# Altium PCB NB3000XN.PcbDoc (part 12 of 71)
Units mil, origin at the board's own origin, x right, y up, seen from the top; angles counter-clockwise.
Board outline 9527.56 x 6929.77 mil, 6 copper layers (Top Layer, GND+SHIELD, MidLayer1, MidLayer2, P2 - 3V3+5V0, Bottom Layer), stack 62.375 mil thick; 832 components, 1027 nets, 4655 pads, 4981 vias.
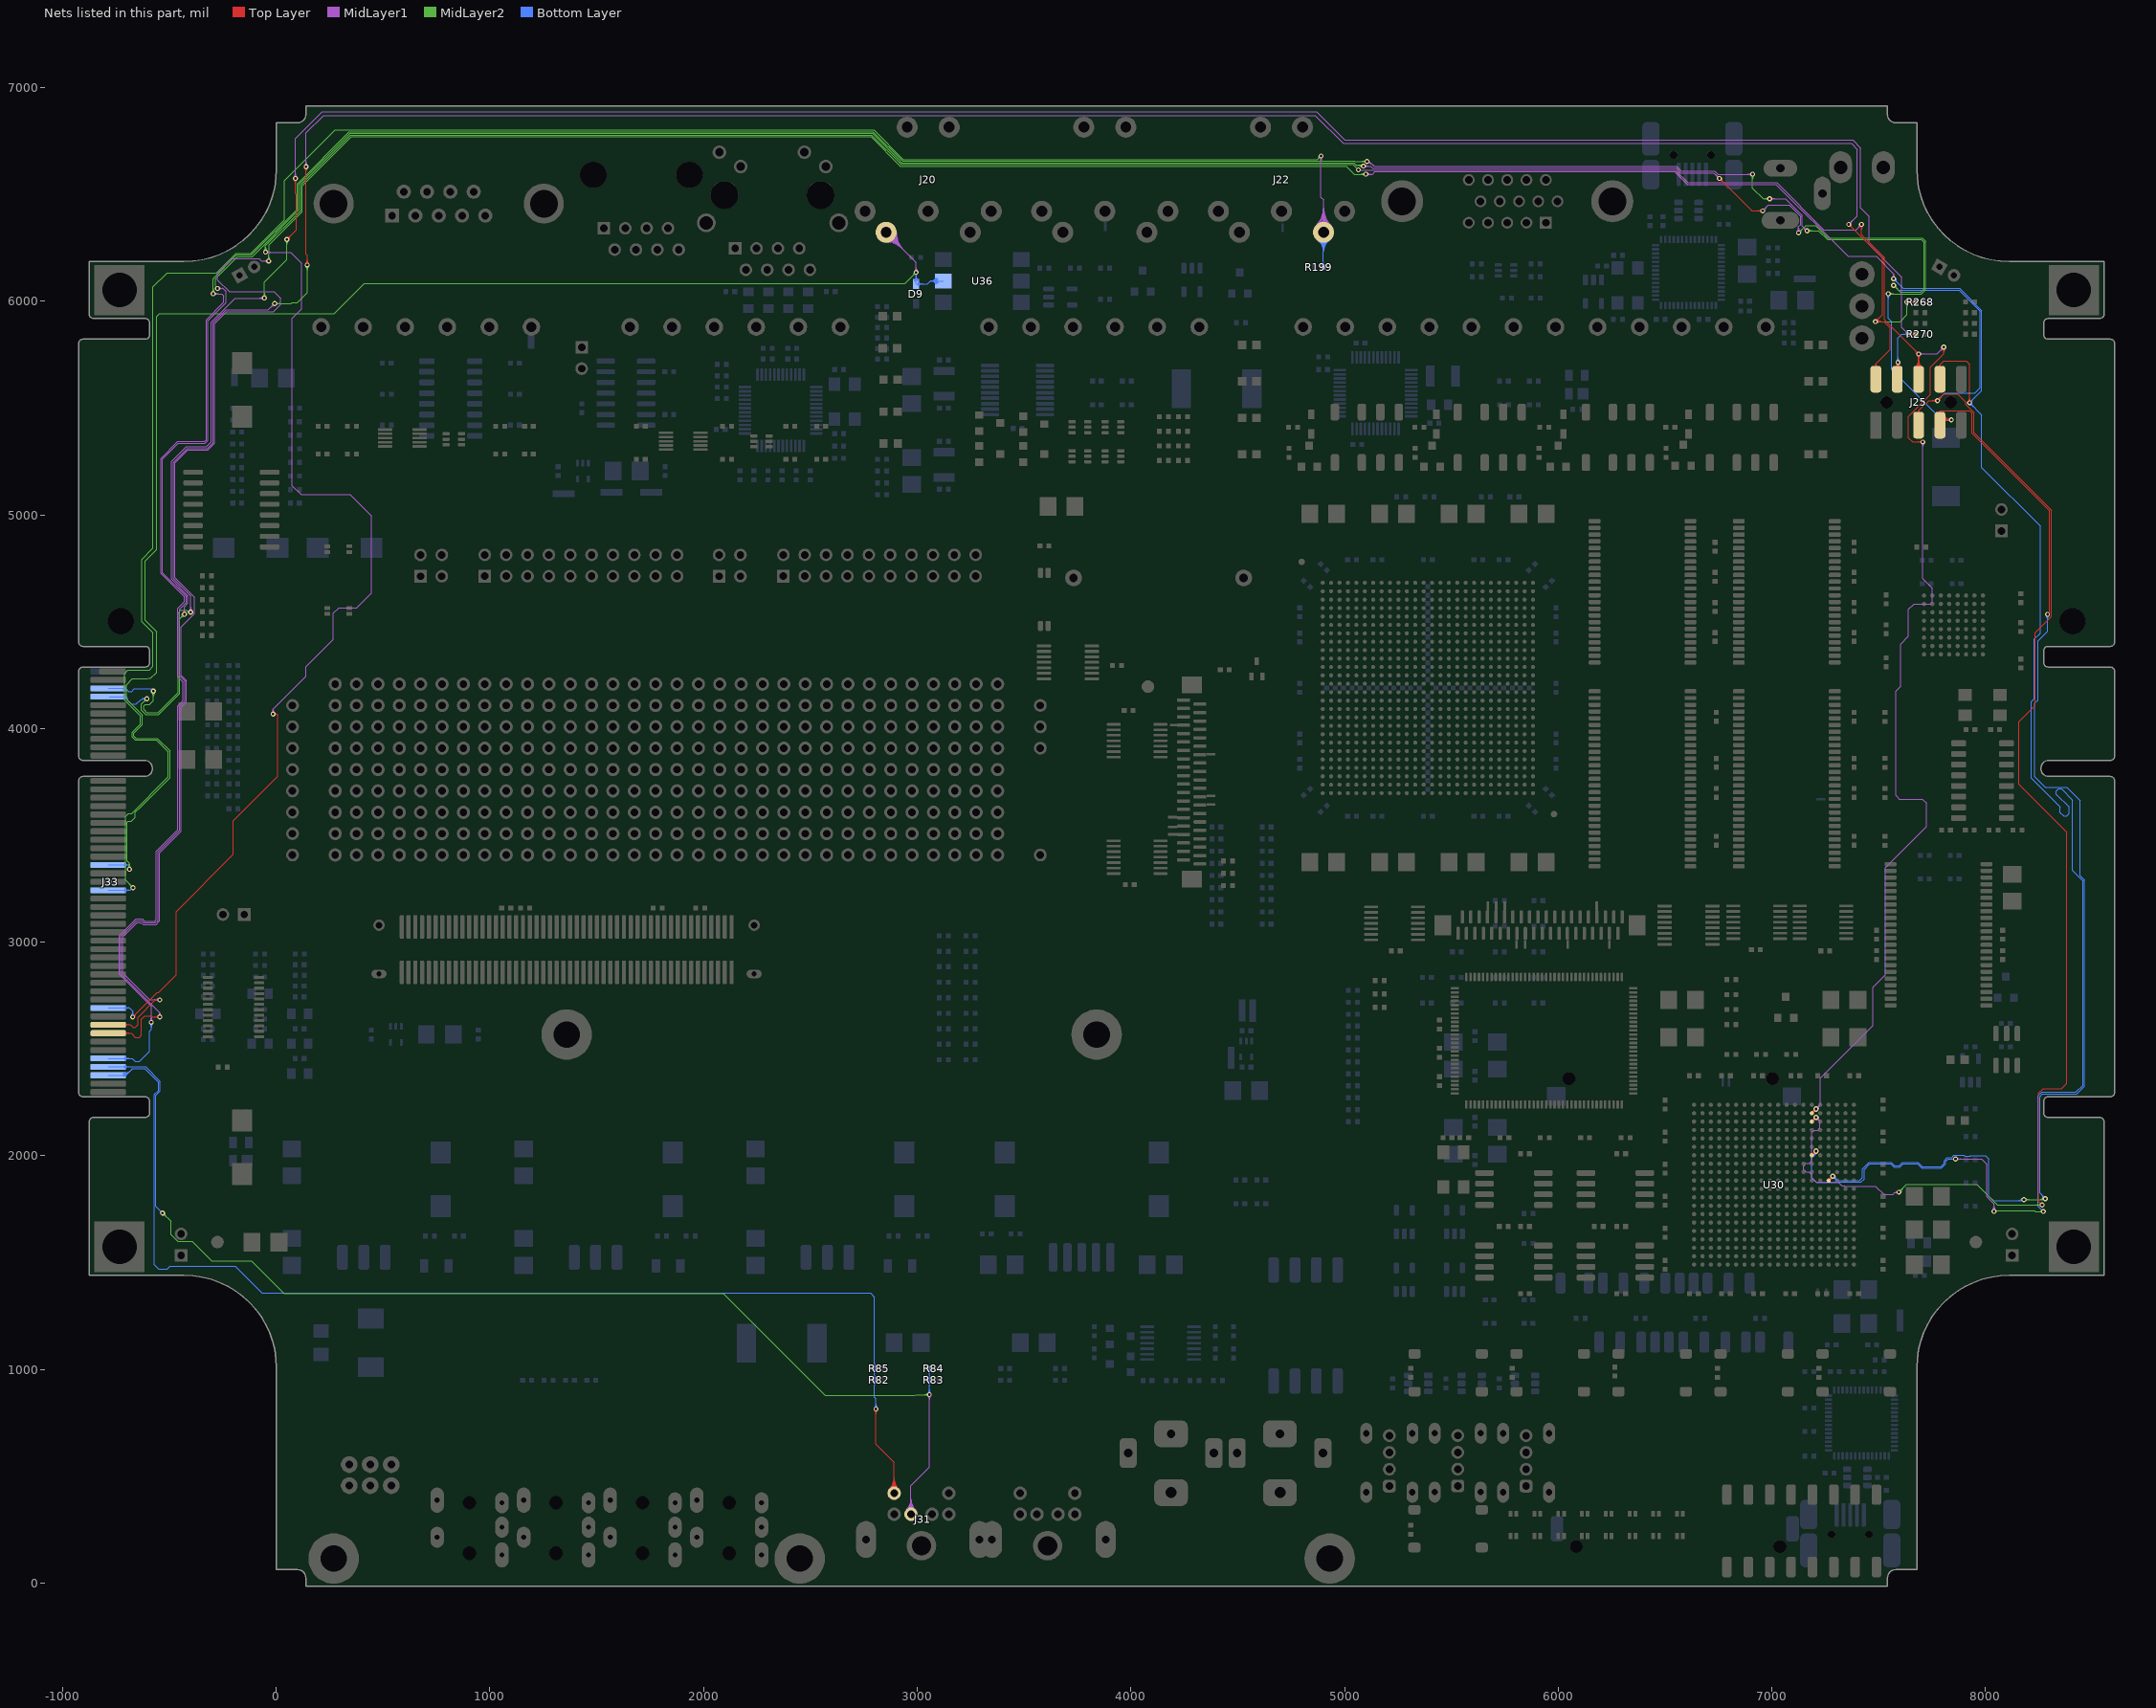
[diagram p16: the nets of this part, all layers, seen from the top]

## Via types
v1: diameter 23, hole 11.81, Top Layer to Bottom Layer, 3672 vias
v2: diameter 26, hole 11.81, Top Layer to Bottom Layer, 461 vias
v3: diameter 19, hole 11.81, Top Layer to Bottom Layer, tented both sides, 396 vias
v4: diameter 23.62, hole 11.81, Top Layer to Bottom Layer, 288 vias
v5: diameter 20, hole 11.81, Top Layer to Bottom Layer, 91 vias
v6: diameter 23, hole 11.81, Top Layer to Bottom Layer, tented both sides, 50 vias
v7: diameter 31, hole 11.81, Top Layer to Bottom Layer, 15 vias
v8: diameter 27.56, hole 11.81, Top Layer to Bottom Layer, tented both sides, 4 vias
v9: diameter 29, hole 11.81, Top Layer to Bottom Layer, 3 vias
v10: diameter 21, hole 11.81, Top Layer to Bottom Layer, 1 vias

## Nets (pads, with @x,y where several pads share a name; then routed paths per layer and width w, separated by ;. In a path a pad name is that pad's centre, name@x,y a point inside that pad or via, vN(x,y) a via of type N, cw(c..) or ccw(c..) an arc to the next point about the centre after c; other vN are vias at no path point) (continued)
ATE.HOST_JTAG.HARD.TDO: J25.2 J33.B3 R268.1 | length 13855.9
  Top Layer w4: v4@133.06,6623.06 cw(c116.31,6606.31) 140,6606.31 cw(c163.69,6606.31) v4@146.94,6623.06 ; v4@135.89,6625.89 cw(c125.97,6615.97) 140,6615.97 cw(c154.03,6615.97) v4@144.11,6625.89 ; v4@138.06,6176.94 ccw(c121.31,6193.69) 145,6193.69 ccw(c168.69,6193.69) v4@151.94,6176.94 ; v4(140,6630) 140,6220 145,6215 v4(145,6170) ; v4@140.89,6174.11 ccw(c130.97,6184.03) 145,6184.03 ccw(c159.03,6184.03) v4@149.11,6174.11 ; v4@7360,6350.19 cw(c7360,6326.5) 7376.75,6343.25 cw(c7393.5,6360) v4@7369.81,6360 ; v4@7360,6354.19 cw(c7360,6340.16) 7369.92,6350.08 cw(c7379.84,6360) v4@7365.81,6360 ; v4(7360,6360) 7518.05,6201.95 7518.05,5938.05 v4(7485,5905) 7524.05,5905 7555,5874.05 7555,5775 7486.99,5706.99 ; J25.2@7478.3,5694.04 ccw(c7473.01,5706.99) 7486.99,5706.99 ; J25.2@7479.81,5690.34 ccw(c7475.44,5701.04) 7486.99,5701.04 ccw(c7498.55,5701.04) J25.2@7494.18,5690.34 ; J25.2@7481.58,5695.1 ccw(c7479.91,5701.99) 7486.99,5701.99 ; J25.2@7484.89,5574.85 cw(c7484.68,5572.54) 7486.99,5572.54 ; v4@7485,5910.81 ccw(c7485,5924.84) 7494.92,5914.92 ccw(c7504.84,5905) v4@7490.81,5905 ; v4@7485,5914.81 ccw(c7485,5938.5) 7501.75,5921.75 ccw(c7518.5,5905) v4@7494.81,5905 ; J25.2@7489.1,5574.85 ccw(c7489.31,5572.54) 7486.99,5572.54 ; v4@7489.11,5900.89 cw(c7499.03,5890.97) 7499.03,5905 cw(c7499.03,5919.03) v4@7489.11,5909.11 ; v4@7491.94,5898.06 cw(c7508.69,5881.31) 7508.69,5905 cw(c7508.69,5928.69) v4@7491.94,5911.94 ; J25.2@7492.41,5695.1 cw(c7494.08,5701.99) 7486.99,5701.99 ; J25.2@7495.69,5694.04 cw(c7500.98,5706.99) 7486.99,5706.99 ; v4(7632,5997) R268.1@7673.82,5997 ; v4@7636.11,5992.89 cw(c7646.03,5982.97) 7646.03,5997 cw(c7646.03,6011.03) v4@7636.11,6001.11 ; v4@7638.94,5990.06 cw(c7655.69,5973.31) 7655.69,5997 cw(c7655.69,6020.69) v4@7638.94,6003.94 ; R268.1@7667.23,5990.41 ccw(c7651.32,5974.5) 7651.32,5997 ccw(c7651.32,6019.5) R268.1@7667.23,6003.59 ; R268.1@7670.06,5993.24 ccw(c7660.98,5984.16) 7660.98,5997 ccw(c7660.98,6009.84) R268.1@7670.06,6000.76 ; 7486.99,5572.54 J25.2@7486.99,5635.25 ; J25.2@7486.99,5635.25 J25.2@7486.99,5635.59 ; J25.2@7486.99,5635.25 J25.2@7486.99,5635.59 ; J25.2@7486.99,5635.59 7486.99,5706.99 ; J25.2@7486.99,5635.59 7486.99,5701.99
  MidLayer1 w4: v4@-406.94,4551.94 ccw(c-423.69,4568.69) -400,4568.69 ccw(c-376.31,4568.69) v4@-393.06,4551.94 ; v4@-404.11,4549.11 ccw(c-414.03,4559.03) -400,4559.03 ccw(c-385.97,4559.03) v4@-395.89,4549.11 ; v4(-400,4545) -400,4620 -407.83,4627.84 -482,4702 -482,5246.69 -417.12,5311.56 -322.46,5311.56 -295.52,5338.51 -295.52,5899.23 -234.74,5960 -36.47,5960 v4(-7.38,5989.09) ; v4@-17.19,5989.09 cw(c-40.87,5989.09) -24.13,5972.34 cw(c-7.38,5955.59) v4@-7.38,5979.28 ; v4@-13.19,5989.09 cw(c-27.22,5989.09) -17.3,5979.17 cw(c-7.38,5969.25) v4@-7.38,5983.28 ; v4@133.06,6636.94 ccw(c116.31,6653.69) 140,6653.69 ccw(c163.69,6653.69) v4@146.94,6636.94 ; v4@135.89,6634.11 ccw(c125.97,6644.03) 140,6644.03 ccw(c154.03,6644.03) v4@144.11,6634.11 ; v4(140,6630) 140,6788.69 221.59,6870.28 4862.1,6870.28 4993.37,6739 7372.06,6739 7400,6711.06 7400,6400 v4(7360,6360) ; v4@7360,6365.81 ccw(c7360,6379.84) 7369.92,6369.92 ccw(c7379.84,6360) v4@7365.81,6360 ; v4@7360,6369.81 ccw(c7360,6393.5) 7376.75,6376.75 ccw(c7393.5,6360) v4@7369.81,6360
  MidLayer2 w4: v4@-581.94,4168.06 cw(c-598.69,4151.31) -575,4151.31 cw(c-551.31,4151.31) v4@-568.06,4168.06 ; v4@-579.11,4170.89 cw(c-589.03,4160.97) -575,4160.97 cw(c-560.97,4160.97) v4@-570.89,4170.89 ; v4(-575,4175) -575,4131.31 -593.81,4112.5 -612.5,4112.5 -620,4105 -620,4090 -605.61,4075.61 -551.61,4075.61 -458.98,4168.24 -458.98,4541.21 -447.19,4553 -420,4553 -412,4545 v4(-400,4545) ; v4(-7.38,5989.09) 70.59,5989.09 75,5993.5 98.5,5993.5 145,6040 v4(145,6170) ; v4@-3.27,5984.98 cw(c6.65,5975.06) 6.65,5989.09 cw(c6.65,6003.12) v4@-3.27,5993.2 ; v4@-0.44,5982.15 cw(c16.31,5965.4) 16.31,5989.09 cw(c16.31,6012.77) v4@-0.44,5996.02 ; v4@138.06,6163.06 cw(c121.31,6146.31) 145,6146.31 cw(c168.69,6146.31) v4@151.94,6163.06 ; v4@140.89,6165.89 cw(c130.97,6155.97) 145,6155.97 cw(c159.03,6155.97) v4@149.11,6165.89 ; v4(7485,5905) 7600,5905 7632,5937 v4(7632,5997) ; v4@7489.11,5900.89 cw(c7499.03,5890.97) 7499.03,5905 cw(c7499.03,5919.03) v4@7489.11,5909.11 ; v4@7491.94,5898.06 cw(c7508.69,5881.31) 7508.69,5905 cw(c7508.69,5928.69) v4@7491.94,5911.94 ; v4@7625.06,5990.06 cw(c7608.31,5973.31) 7632,5973.31 cw(c7655.69,5973.31) v4@7638.94,5990.06 ; v4@7627.89,5992.89 cw(c7617.97,5982.97) 7632,5982.97 cw(c7646.03,5982.97) v4@7636.11,5992.89
  Bottom Layer w4: J33.B3@-785.98,4188.29 -705.14,4188.29 -691.06,4174.21 -676.56,4174.21 -664.89,4185.87 -580.87,4185.87 v4@-575,4180 ; J33.B3@-717.13,4188.51 cw(c-713.23,4170.99) -700.53,4183.68 ; J33.B3@-716.26,4184.61 cw(c-711.35,4162.57) -695.39,4178.53 ; J33.B3@-715.39,4180.7 cw(c-709.47,4154.15) -690.24,4173.39
ATE.HOST_JTAG.HARD.TMS: J25.4 J33.B4 R270.1 | length 13306.8
  Top Layer w4: v4(50,6290) 95,6335 95,6500 90,6505 v4(90,6575) ; v4@50,6295.81 ccw(c50,6309.84) 59.92,6299.92 ccw(c69.84,6290) v4@55.81,6290 ; v4@50,6299.81 ccw(c50,6323.5) 66.75,6306.75 ccw(c83.5,6290) v4@59.81,6290 ; v4@83.06,6568.06 cw(c66.31,6551.31) 90,6551.31 cw(c113.69,6551.31) v4@96.94,6568.06 ; v4@85.89,6570.89 cw(c75.97,6560.97) 90,6560.97 cw(c104.03,6560.97) v4@94.11,6570.89 ; J25.4@7577.2,5693.56 ccw(c7567.56,5714.04) v1(7590.19,5714.04) ; J25.4@7578.9,5689.94 ccw(c7570.52,5707.74) v1@7590.19,5707.74 ; J25.4@7580.6,5686.32 ccw(c7573.49,5701.43) 7590.19,5701.43 ; v1@7583.47,5707.32 cw(c7567.26,5691.11) 7590.19,5691.11 cw(c7613.13,5691.11) v1@7596.91,5707.32 ; J25.4@7585,5630 J25.4@7590.19,5635.19 ; v1@7586.3,5710.15 cw(c7576.91,5700.76) 7590.19,5700.76 cw(c7603.47,5700.76) v1@7594.08,5710.15 ; J25.4@7590.19,5635.25 v1(7590.19,5714.04) ; v1@7590.19,5705.7 ccw(c7613.44,5705.7) J25.4@7598.89,5687.57 ; J25.4@7601.39,5690.69 cw(c7620.13,5714.04) v1(7590.19,5714.04) ; v4(7640,5845) 7672.82,5845 R270.1@7673.82,5846 ; v4@7644.11,5840.89 cw(c7654.03,5830.97) 7654.03,5845 cw(c7654.03,5859.03) v4@7644.11,5849.11 ; v4@7646.94,5838.06 cw(c7663.69,5821.31) 7663.69,5845 cw(c7663.69,5868.69) v4@7646.94,5851.94 ; v4@7650.09,5845 ccw(c7650.09,5869.23) R270.1@7667.23,5852.1 ; 7652.55,5845 cw(c7652.55,5824.24) R270.1@7667.23,5838.92 ; 7659.75,5845 ccw(c7659.75,5859.57) R270.1@7670.06,5849.27 ; 7662.2,5845 cw(c7662.2,5833.89) R270.1@7670.06,5841.75
  MidLayer1 w4: v4@-436.94,4541.94 ccw(c-453.69,4558.69) -430,4558.69 ccw(c-406.31,4558.69) v4@-423.06,4541.94 ; v4@-434.11,4539.11 ccw(c-444.03,4549.03) -430,4549.03 ccw(c-415.97,4549.03) v4@-425.89,4539.11 ; v4(-430,4535) -430,4570.19 -413.5,4586.69 -413.5,4622.19 -490,4698.69 -490,5250 -420.44,5319.56 -325.78,5319.56 -303.52,5341.82 -303.52,5902.54 -191.06,6015 v4(-55,6015) ; v4@-61.94,6008.06 ccw(c-78.69,5991.31) -78.69,6015 ccw(c-78.69,6038.69) v4@-61.94,6021.94 ; v4@-59.11,6010.89 ccw(c-69.03,6000.97) -69.03,6015 ccw(c-69.03,6029.03) v4@-59.11,6019.11 ; v4@83.06,6581.94 ccw(c66.31,6598.69) 90,6598.69 ccw(c113.69,6598.69) v4@96.94,6581.94 ; v4@85.89,6579.11 ccw(c75.97,6589.03) 90,6589.03 ccw(c104.03,6589.03) v4@94.11,6579.11 ; v4(90,6575) 90,6761.31 214.96,6886.28 4868.72,6886.28 5000,6755 7378.69,6755 7416,6717.69 7416,6436.31 7454.85,6397.46 7454.85,6266.46 7590.26,6131.06 7608,6113.31 7608,5947 7608,5877 v4(7640,5845) ; v4@7630.19,5845 ccw(c7606.5,5845) 7623.25,5861.75 ccw(c7640,5878.5) v4@7640,5854.81 ; v4@7634.19,5845 ccw(c7620.16,5845) 7630.08,5854.92 ccw(c7640,5864.84) v4@7640,5850.81
  MidLayer2 w4: v4@-614.81,4140 cw(c-638.5,4140) -621.75,4123.25 cw(c-605,4106.5) v4@-605,4130.19 ; v4@-610.81,4140 cw(c-624.84,4140) -614.92,4130.08 cw(c-605,4120.16) v4@-605,4134.19 ; v4(-605,4140) -630,4115 -630,4085 -610,4065 -550.9,4065 -450.98,4164.93 -450.98,4514.02 v4(-430,4535) ; v4@-439.81,4535 cw(c-463.5,4535) -446.75,4518.25 cw(c-430,4501.5) v4@-430,4525.19 ; v4@-435.81,4535 cw(c-449.84,4535) -439.92,4525.08 cw(c-430,4515.16) v4@-430,4529.19 ; v4@-61.94,6021.94 ccw(c-78.69,6038.69) -55,6038.69 ccw(c-31.31,6038.69) v4@-48.06,6021.94 ; v4@-59.11,6019.11 ccw(c-69.03,6029.03) -55,6029.03 ccw(c-40.97,6029.03) v4@-50.89,6019.11 ; v4(-55,6015) -55,6090 50,6195 v4(50,6290) ; v4@43.06,6283.06 cw(c26.31,6266.31) 50,6266.31 cw(c73.69,6266.31) v4@56.94,6283.06 ; v4@45.89,6285.89 cw(c35.97,6275.97) 50,6275.97 cw(c64.03,6275.97) v4@54.11,6285.89
  Bottom Layer w4: J33.B4@-780,4148.92 -703.95,4148.92 -695,4139.98 -695,4131 -679,4115 -655,4115 -633.87,4136.13 -629.86,4136.13 -625.99,4140 ; J33.B4@-717.17,4149.13 cw(c-711.42,4135.58) -701.01,4145.99 ; J33.B4@-715.61,4145.45 cw(c-708.92,4129.69) -696.82,4141.79 ; v4@-612.53,4133.71 ccw(c-625.99,4122.46) -625.99,4140 ; v4@-612.53,4146.29 cw(c-625.99,4157.54) -625.99,4140 ; v4@-609.46,4136.27 ccw(c-617.43,4129.61) -617.43,4140 ccw(c-617.43,4150.39) v4@-609.46,4143.73 ; v4(-605,4140) -625.99,4140 ; v1@7583.47,5720.76 ccw(c7567.26,5736.98) 7590.19,5736.98 ccw(c7613.13,5736.98) v1@7596.91,5720.76 ; v1@7586.3,5717.93 ccw(c7576.91,5727.32) 7590.19,5727.32 ccw(c7603.47,5727.32) v1@7594.08,5717.93 ; v1(7590.19,5714.04) 7590.19,5827.37 7607.82,5845 v4(7640,5845) ; v4@7633.06,5838.06 ccw(c7616.31,5821.31) 7616.31,5845 ccw(c7616.31,5868.69) v4@7633.06,5851.94 ; v4@7635.89,5840.89 ccw(c7625.97,5830.97) 7625.97,5845 ccw(c7625.97,5859.03) v4@7635.89,5849.11
ATE.HOST_JTAG.SOFT.TCK: J25.7 J33.A42 U30.D10 | length 21667.9
  Top Layer w4: J33.A42@-785.98,2574.12 -679.12,2574.12 -660,2555 -640,2555 -630,2565 -630,2640 -615,2655 -585,2655 -580,2650 v4(-545,2650) ; J33.A42@-711.58,2568.62 cw(c-698.3,2555.34) -698.3,2574.12 cw(c-698.3,2592.9) J33.A42@-711.58,2579.62 ; J33.A42@-708.76,2565.79 cw(c-688.65,2545.68) -688.65,2574.12 cw(c-688.65,2602.56) J33.A42@-708.76,2582.45 ; v4@-551.94,2643.06 ccw(c-568.69,2626.31) -568.69,2650 ccw(c-568.69,2673.69) v4@-551.94,2656.94 ; v4@-549.11,2645.89 ccw(c-559.03,2635.97) -559.03,2650 ccw(c-559.03,2664.03) v4@-549.11,2654.11 ; v4@6755,6565.19 cw(c6755,6541.5) 6771.75,6558.25 cw(c6788.5,6575) v4@6764.81,6575 ; v4@6755,6569.19 cw(c6755,6555.16) 6764.92,6565.08 cw(c6774.84,6575) v4@6760.81,6575 ; v4(6755,6575) 6907,6423 v4(6957,6423) ; v4@6950.06,6416.06 ccw(c6933.31,6399.31) 6933.31,6423 ccw(c6933.31,6446.69) v4@6950.06,6429.94 ; v4@6952.89,6418.89 ccw(c6942.97,6408.97) 6942.97,6423 ccw(c6942.97,6437.03) v4@6952.89,6427.11 ; J25.7@7781.58,5480.1 ccw(c7779.91,5486.99) 7786.99,5486.99 ; J25.7@7789.78,5458.88 ccw(c7810.35,5467.19) J25.7@7810.35,5445 ; J25.7@7792.41,5480.1 cw(c7794.08,5486.99) 7786.99,5486.99 ; J25.7@7793.48,5460.37 ccw(c7816.28,5469.58) 7816.28,5445 ; J25.7@7797.19,5461.87 ccw(c7822.21,5471.98) 7822.21,5445 ; J25.7@7800.9,5463.37 ccw(c7828.14,5474.38) 7828.14,5445 ; J25.7@7803.26,5441.49 cw(c7811.73,5433.01) J25.7@7811.73,5445 ; J25.7@7804.61,5464.87 ccw(c7834.07,5476.77) v4@7834.07,5445 ; J25.7@7808.32,5466.37 ccw(c7840,5479.17) v4(7840,5445) ; v4@7833.06,5438.06 ccw(c7816.31,5421.31) 7816.31,5445 ccw(c7816.31,5468.69) v4@7833.06,5451.94 ; v4@7835.89,5440.89 ccw(c7825.97,5430.97) 7825.97,5445 ccw(c7825.97,5459.03) v4@7835.89,5449.11 ; v4(7840,5445) J25.7@7811.74,5445 ; v4(8290,4535) 8299.81,4544.81 8299.81,5018.88 7937,5381.69 7937,5476.5 7924.75,5488.75 7788.75,5488.75 7786.99,5486.99 ; 7786.99,5486.99 J25.7@7786.99,5420.25 J25.7@7811.74,5445
  Top Layer w8: U30.D10@7265.91,1884.68 v2(7285.59,1904.37) ; U30.D10@7265.91,1890.53 ccw(c7265.91,1904.63) 7275.88,1894.66 ccw(c7285.85,1884.68) U30.D10@7271.75,1884.68 ; v2@7276.59,1904.37 cw(c7254.86,1904.37) 7270.23,1889.01 cw(c7285.59,1873.64) v2@7285.59,1895.37
  MidLayer1 w4: -553,3211.14 -553,3103.31 -565.11,3091.21 -619.58,3091.21 -628.91,3100.54 -653.35,3100.54 -726.5,3027.39 -726.5,2852.79 -545,2671.29 ; -552.98,3211.16 -552.98,3422.93 -460.78,3515.13 -452.81,3523.1 -452.81,4103.31 -428,4128.12 -428,4221.88 -452.81,4246.69 -452.81,4558.69 -421.5,4590 -421.5,4618.88 -532.14,4729.52 -532.14,5261.54 -458.12,5335.56 -332.4,5335.56 -319.52,5348.45 -319.52,5909.17 -235,5993.69 -235,6045.19 -249.15,6059.34 ; v4@-551.37,2657.46 ccw(c-563.2,2671.29) -545,2671.29 ; v4@-548.78,2654.42 ccw(c-555.78,2662.61) -545,2662.61 ccw(c-534.22,2662.61) v4@-541.22,2654.42 ; v4(-545,2650) -545,2671.29 ; v4@-538.63,2657.46 cw(c-526.8,2671.29) -545,2671.29 ; v4(-275,6060) -249.15,6060 ; v4@-270.89,6055.89 cw(c-260.97,6045.97) -260.97,6060 cw(c-260.97,6074.03) v4@-270.89,6064.11 ; v4@-268.06,6053.06 cw(c-251.31,6036.31) -251.31,6060 cw(c-251.31,6083.69) v4@-268.06,6066.94 ; v4(5088.13,6632.81) 5122.19,6632.81 5132,6623 6550.25,6623 6571.69,6601.56 6728.44,6601.56 v4(6755,6575) ; v4@5092.23,6628.7 cw(c5102.15,6618.78) 5102.15,6632.81 cw(c5102.15,6646.84) v4@5092.23,6636.92 ; v4@5095.06,6625.87 cw(c5111.81,6609.13) 5111.81,6632.81 cw(c5111.81,6656.5) v4@5095.06,6639.75 ; v4@6745.19,6575 ccw(c6721.5,6575) 6738.25,6591.75 ccw(c6755,6608.5) v4@6755,6584.81 ; v4@6749.19,6575 ccw(c6735.16,6575) 6745.08,6584.92 ccw(c6755,6594.84) v4@6755,6580.81 ; v4(6957,6423) 6984,6450 7082.01,6450 7134.58,6397.42 7134.58,6359.84 7125,6350.25 v4(7125,6320) ; v4@6957,6428.81 ccw(c6957,6442.84) 6966.92,6432.92 ccw(c6976.84,6423) v4@6962.81,6423 ; v4@6957,6432.81 ccw(c6957,6456.5) 6973.75,6439.75 ccw(c6990.5,6423) v4@6966.81,6423 ; v4@7118.06,6326.94 ccw(c7101.31,6343.69) 7125,6343.69 ccw(c7148.69,6343.69) v4@7131.94,6326.94 ; v4@7120.89,6324.11 ccw(c7110.97,6334.03) 7125,6334.03 ccw(c7139.03,6334.03) v4@7129.11,6324.11
  MidLayer2 w4: v4(-275,6060) -285,6070 -285,6105 -181.05,6208.95 -112.36,6208.95 106,6427.31 106,6546.94 345.06,6786 2790.31,6786 2911.31,6665 2928.31,6648 5043.31,6648 5054.31,6637 ; 5063.98,6637 cw(c5063.98,6608.67) v4@5084.02,6628.7 ; 5073.64,6637 cw(c5073.64,6618.33) v4@5086.85,6631.53 ; 5074.55,6637 ccw(c5074.55,6646.38) v4@5081.19,6639.75 ; v4@5081.19,6625.87 ccw(c5054.33,6599.01) 5054.33,6637 ; v4(5088.13,6632.81) 5092.19,6632.81 5088,6637 5054.31,6637 ; v4(7125,6320) 7160,6355 7205,6355 7263.5,6296.5 7703.5,6296.5 7720,6280 7720,6055 7700,6035 v4(7545,6035) ; v4@7125,6325.81 ccw(c7125,6339.84) 7134.92,6329.92 ccw(c7144.84,6320) v4@7130.81,6320 ; v4@7125,6329.81 ccw(c7125,6353.5) 7141.75,6336.75 ccw(c7158.5,6320) v4@7134.81,6320 ; v4@7549.11,6030.89 cw(c7559.03,6020.97) 7559.03,6035 cw(c7559.03,6049.03) v4@7549.11,6039.11 ; v4@7551.94,6028.06 cw(c7568.69,6011.31) 7568.69,6035 cw(c7568.69,6058.69) v4@7551.94,6041.94 ; v4(8180,1795) 8275,1795 v4(8280,1800) ; v4@8184.11,1790.89 cw(c8194.03,1780.97) 8194.03,1795 cw(c8194.03,1809.03) v4@8184.11,1799.11 ; v4@8186.94,1788.06 cw(c8203.69,1771.31) 8203.69,1795 cw(c8203.69,1818.69) v4@8186.94,1801.94 ; 8244.24,1795 ccw(c8244.24,1835.76) v4@8273.06,1806.94 ; 8253.9,1795 ccw(c8253.9,1826.1) v4@8275.89,1804.11 ; 8263.56,1795 ccw(c8263.56,1816.44) v4@8278.72,1801.28 ; 8268.39,1795 cw(c8268.39,1788.39) v4@8273.06,1793.06
  Bottom Layer w4: v2@7285.59,1893.37 cw(c7285.59,1866.81) 7304.37,1885.59 cw(c7323.15,1904.37) v2@7296.59,1904.37 ; v2@7285.59,1897.37 cw(c7285.59,1880.47) 7297.54,1892.42 cw(c7309.49,1904.37) v2@7292.59,1904.37 ; v2(7285.59,1904.37) 7304.96,1885 7411.2,1885 7424.02,1897.82 7424.02,1939.21 7455.19,1970.37 7558.79,1970.37 7559.5,1969.67 7559.5,1969.44 7574.44,1954.5 7595.56,1954.5 7611.27,1970.21 7684.4,1970.21 7704.6,1950 7790.4,1950 7806.36,1965.96 7806.36,1977.27 7821.29,1992.21 7842.02,1992.21 7852.62,2002.81 7899.36,2002.81 7902.67,1999.5 7927.71,1999.5 7929.09,2000.87 7999.13,2000.87 8015.48,1984.52 8015.48,1811.35 8036.83,1790 8175,1790 v4(8180,1795) ; v4@7538.06,6028.06 cw(c7521.31,6011.31) 7545,6011.31 cw(c7568.69,6011.31) v4@7551.94,6028.06 ; v4@7540.89,6030.89 cw(c7530.97,6020.97) 7545,6020.97 cw(c7559.03,6020.97) v4@7549.11,6030.89 ; v4(7545,6035) 7545,5920 7560,5905 7560,5680 7795,5445 v4(7840,5445) ; v4@7833.06,5438.06 ccw(c7816.31,5421.31) 7816.31,5445 ccw(c7816.31,5468.69) v4@7833.06,5451.94 ; v4@7835.89,5440.89 ccw(c7825.97,5430.97) 7825.97,5445 ccw(c7825.97,5459.03) v4@7835.89,5449.11 ; 8144.24,1790 ccw(c8144.24,1830.76) v4@8173.06,1801.94 ; 8153.9,1790 ccw(c8153.9,1821.1) v4@8175.89,1799.11 ; 8163.56,1790 ccw(c8163.56,1811.44) v4@8178.72,1796.28 ; 8168.39,1790 cw(c8168.39,1783.39) v4@8173.06,1788.06 ; v4@8270.19,1800 ccw(c8246.5,1800) 8263.25,1816.75 ccw(c8280,1833.5) v4@8280,1809.81 ; v4@8274.19,1800 ccw(c8260.16,1800) 8270.08,1809.92 ccw(c8280,1819.84) v4@8280,1805.81 ; v4(8280,1800) 8254,1826 8254,2276.93 8267.01,2289.94 8427.31,2289.94 8464,2326.62 8464,3289.94 8442.5,3311.44 8442.5,3662.5 8379.46,3725.54 8337.96,3725.54 8336.97,3724.55 8280.45,3724.55 8231.36,3773.64 8231.36,4119.73 8245,4133.37 8245,4410 8290,4455 v4(8290,4535) ; v4@8283.06,4528.06 cw(c8266.31,4511.31) 8290,4511.31 cw(c8313.69,4511.31) v4@8296.94,4528.06 ; v4@8285.89,4530.89 cw(c8275.97,4520.97) 8290,4520.97 cw(c8304.03,4520.97) v4@8294.11,4530.89
ATE.HOST_JTAG.SOFT.TDI: J25.5 J33.B45 U30.F3 | length 22022.3
  Top Layer w4: J25.5@7681.58,5480.1 ccw(c7679.91,5486.99) 7686.99,5486.99 ; J25.5@7686.99,5420.25 7686.99,5486.99 ; J25.5@7692.41,5480.1 cw(c7694.08,5486.99) 7686.99,5486.99 ; v4@7768.06,5528.06 ccw(c7751.31,5511.31) 7751.31,5535 ccw(c7751.31,5558.69) v4@7768.06,5541.94 ; v4@7770.89,5530.89 ccw(c7760.97,5520.97) 7760.97,5535 ccw(c7760.97,5549.03) v4@7770.89,5539.11 ; v4@7775,5540.81 ccw(c7775,5554.84) 7784.92,5544.92 ccw(c7794.84,5535) v4@7780.81,5535 ; v4@7775,5544.81 ccw(c7775,5568.5) 7791.75,5551.75 ccw(c7808.5,5535) v4@7784.81,5535 ; 8248.03,1980.89 8248.03,1985.86 8248.86,1986.69 8248.86,2293.86 8270,2315 8355,2315 8380,2340 8380,3515.58 8156.19,3739.39 8156.19,4031.59 8232.02,4107.43 8232.02,4449.21 8307.81,4525 8307.81,5022.19 7945,5385 7945,5479.81 7907.19,5517.62 7907.19,5527.81 7870,5565 7805,5565 v4(7775,5535) 7735,5535 7686.99,5486.99 ; 8248.19,1980.73 8248.19,1786.81 v4(8265,1770) ; v4@8255.19,1770 ccw(c8231.5,1770) 8248.25,1786.75 ccw(c8265,1803.5) v4@8265,1779.81 ; v4@8259.19,1770 ccw(c8245.16,1770) 8255.08,1779.92 ccw(c8265,1789.84) v4@8265,1775.81
  Top Layer w8: U30.F3@7187.17,2160.28 v2(7206.85,2179.96) ; U30.F3@7187.17,2166.12 ccw(c7187.17,2180.22) 7197.14,2170.25 ccw(c7207.11,2160.28) U30.F3@7193.01,2160.28 ; v2@7197.85,2179.96 cw(c7176.12,2179.96) 7191.49,2164.6 cw(c7206.85,2149.23) v2@7206.85,2170.96
  MidLayer1 w4: v1@-591.53,2631.76 ccw(c-607.74,2647.98) -584.81,2647.98 ccw(c-561.87,2647.98) v1@-578.09,2631.76 ; v1@-588.7,2628.93 ccw(c-598.09,2638.32) -584.81,2638.32 ccw(c-571.53,2638.32) v1@-580.92,2628.93 ; v1(-584.81,2625.04) -584.81,2699.79 -734.5,2849.48 -734.5,3030.71 -656.67,3108.54 -625.6,3108.54 -616.27,3099.21 -568.42,3099.21 -561,3106.63 -561,3214.45 -560.98,3426.25 -460.81,3526.41 -460.81,4106.63 -436,4131.44 -436,4218.56 -460.81,4243.37 -460.81,4562.01 -429.5,4593.32 -429.5,4615.56 -540.14,4726.21 -540.14,5264.86 -461.44,5343.56 -335.72,5343.56 -327.52,5351.76 -327.52,5912.48 -245,5995 -245,6025 -255,6035 v4(-295,6035) ; v4@-290.89,6030.89 cw(c-280.97,6020.97) -280.97,6035 cw(c-280.97,6049.03) v4@-290.89,6039.11 ; v4@-288.06,6028.06 cw(c-271.31,6011.31) -271.31,6035 cw(c-271.31,6058.69) v4@-288.06,6041.94 ; v4@5105,6645.19 cw(c5105,6597.36) 5138.82,6631.18 ; v4@5105,6649.19 cw(c5105,6611.02) 5131.99,6638.01 ; v4@5105,6653.19 cw(c5105,6624.67) 5125.16,6644.84 ; v4(5105,6655) 5115,6655 5139,6631 6553.56,6631 6575,6609.56 6732.45,6609.56 6747.01,6595 v4(6910,6595) ; v4@5105,6657.19 cw(c5105,6638.33) 5118.33,6651.67 ; v4@6903.06,6588.06 ccw(c6886.31,6571.31) 6886.31,6595 ccw(c6886.31,6618.69) v4@6903.06,6601.94 ; v4@6905.89,6590.89 ccw(c6895.97,6580.97) 6895.97,6595 ccw(c6895.97,6609.03) v4@6905.89,6599.11 ; v4(6990,6480) 7063.32,6480 7068.32,6475 7142.58,6400.74 7142.58,6352.42 v4(7165,6330) ; v4@6994.11,6475.89 cw(c7004.03,6465.97) 7004.03,6480 cw(c7004.03,6494.03) v4@6994.11,6484.11 ; v4@6996.94,6473.06 cw(c7013.69,6456.31) 7013.69,6480 cw(c7013.69,6503.69) v4@6996.94,6486.94 ; v4@7155.19,6330 ccw(c7131.5,6330) 7148.25,6346.75 ccw(c7165,6363.5) v4@7165,6339.81 ; v4@7159.19,6330 ccw(c7145.16,6330) 7155.08,6339.92 ccw(c7165,6349.84) v4@7165,6335.81 ; v2@7206.85,2168.96 cw(c7206.85,2142.4) 7225.63,2161.18 cw(c7244.41,2179.96) v2@7217.85,2179.96 ; v2@7206.85,2172.96 cw(c7206.85,2156.06) 7218.8,2168.01 cw(c7230.75,2179.96) v2@7213.85,2179.96 ; v2(7206.85,2179.96) 7225.86,2160.95 7225.86,2131.04 7215.19,2120.37 7199.13,2120.37 7186.52,2107.76 7186.52,1975.28 7175.35,1964.11 7160.98,1964.11 7148.48,1951.61 7148.48,1935.87 7159.61,1924.74 7173.98,1924.74 7186.48,1912.24 7186.48,1897.87 7209.15,1875.2 7312.66,1875.2 7327.23,1860.63 7339.46,1860.63 7341.88,1858.21 7485.73,1858.21 7524.44,1819.5 7567,1819.5 7575,1827.5 ; 7577.35,1827.5 cw(c7577.35,1812.35) v4@7588.06,1823.06 ; 7581.5,1827.5 ccw(c7581.5,1836.81) v4@7589.81,1832.62 ; v4@7586.24,1834.42 cw(c7575,1840.09) 7575,1827.5 ; v4@7592.5,1827.5 7575,1827.5
  MidLayer2 w4: v4@-301.94,6041.94 ccw(c-318.69,6058.69) -295,6058.69 ccw(c-271.31,6058.69) v4@-288.06,6041.94 ; v4@-299.11,6039.11 ccw(c-309.03,6049.03) -295,6049.03 ccw(c-280.97,6049.03) v4@-290.89,6039.11 ; v4(-295,6035) -295,6106.31 -184.36,6216.95 -115.68,6216.95 98,6430.63 98,6550.26 341.74,6794 2793.63,6794 2931.63,6656 5046.63,6656 5047.63,6655 v4(5105,6655) ; v4@5098.06,6648.06 ccw(c5081.31,6631.31) 5081.31,6655 ccw(c5081.31,6678.69) v4@5098.06,6661.94 ; v4@5100.89,6650.89 ccw(c5090.97,6640.97) 5090.97,6655 ccw(c5090.97,6669.03) v4@5100.89,6659.11 ; v4@6903.06,6588.06 cw(c6886.31,6571.31) 6910,6571.31 cw(c6933.69,6571.31) v4@6916.94,6588.06 ; v4@6905.89,6590.89 cw(c6895.97,6580.97) 6910,6580.97 cw(c6924.03,6580.97) v4@6914.11,6590.89 ; v4(6910,6595) 6910,6530 6960,6480 v4(6990,6480) ; v4@6983.06,6473.06 ccw(c6966.31,6456.31) 6966.31,6480 ccw(c6966.31,6503.69) v4@6983.06,6486.94 ; v4@6985.89,6475.89 ccw(c6975.97,6465.97) 6975.97,6480 ccw(c6975.97,6494.03) v4@6985.89,6484.11 ; v4(7165,6330) 7218.69,6330 7260.19,6288.5 7700.19,6288.5 7712,6276.69 7712,6058.31 7696.69,6043 7602,6043 v4(7570,6075) ; v4@7169.11,6325.89 cw(c7179.03,6315.97) 7179.03,6330 cw(c7179.03,6344.03) v4@7169.11,6334.11 ; v4@7171.94,6323.06 cw(c7188.69,6306.31) 7188.69,6330 cw(c7188.69,6353.69) v4@7171.94,6336.94 ; v4@7570,6065.19 cw(c7570,6041.5) 7586.75,6058.25 cw(c7603.5,6075) v4@7579.81,6075 ; v4@7570,6069.19 cw(c7570,6055.16) 7579.92,6065.08 cw(c7589.84,6075) v4@7575.81,6075 ; v4(7595,1830) 7630.87,1865.87 7959.13,1865.87 8055,1770 v4(8265,1770) ; v4@7595,1835.81 ccw(c7595,1849.84) 7604.92,1839.92 ccw(c7614.84,1830) v4@7600.81,1830 ; v4@7595,1839.81 ccw(c7595,1863.5) 7611.75,1846.75 ccw(c7628.5,1830) v4@7604.81,1830 ; v4@8258.06,1763.06 ccw(c8241.31,1746.31) 8241.31,1770 ccw(c8241.31,1793.69) v4@8258.06,1776.94 ; v4@8260.89,1765.89 ccw(c8250.97,1755.97) 8250.97,1770 ccw(c8250.97,1784.03) v4@8260.89,1774.11
  Bottom Layer w4: J33.B45@-785.98,2456.01 -673.84,2456.01 -659.54,2441.71 -640.48,2441.71 -593.14,2489.04 -593.14,2583.37 -584.81,2591.71 v1(-584.81,2625.04) ; J33.B45@-711.58,2450.51 cw(c-698.3,2437.23) -698.3,2456.01 cw(c-698.3,2474.79) J33.B45@-711.58,2461.51 ; J33.B45@-708.76,2447.68 cw(c-688.65,2427.57) -688.65,2456.01 cw(c-688.65,2484.45) J33.B45@-708.76,2464.34 ; v1@-591.53,2618.32 cw(c-607.74,2602.11) -584.81,2602.11 cw(c-561.87,2602.11) v1@-578.09,2618.32 ; v1@-588.7,2621.15 cw(c-598.09,2611.76) -584.81,2611.76 cw(c-571.53,2611.76) v1@-580.92,2621.15 ; v4@7570,6065.19 cw(c7570,6041.5) 7586.75,6058.25 cw(c7603.5,6075) v4@7579.81,6075 ; v4@7570,6069.19 cw(c7570,6055.16) 7579.92,6065.08 cw(c7589.84,6075) v4@7575.81,6075 ; v4(7570,6075) 7593,6052 7876.33,6052 7974.81,5953.52 7974.81,5595 7949.81,5570 7810,5570 v4(7775,5535) ; v4@7775,5540.81 ccw(c7775,5554.84) 7784.92,5544.92 ccw(c7794.84,5535) v4@7780.81,5535 ; v4@7775,5544.81 ccw(c7775,5568.5) 7791.75,5551.75 ccw(c7808.5,5535) v4@7784.81,5535
ATE.HOST_JTAG.SOFT.TDO: J25.6 J33.B39 U30.F2 | length 19230.6
  Top Layer w4: v1(-671.81,2650.04) -556.69,2765.16 -550.02,2765.16 -468.14,2847.04 -468.14,3144.08 -201.35,3410.87 -201.35,3568.4 6.86,3776.6 6.86,4063.14 2.29,4067.71 ; v1@-671.81,2655.54 ccw(c-671.81,2668.82) -662.42,2659.43 ccw(c-653.03,2650.04) v1@-666.31,2650.04 ; v1@-671.81,2659.54 ccw(c-671.81,2682.48) -655.59,2666.26 ccw(c-639.37,2650.04) v1@-662.31,2650.04 ; v1(-14.48,4067.71) 2.29,4067.71 ; v1@-6.33,4062.82 cw(c2.29,4057.66) 2.29,4067.71 ; v1@-6.33,4072.59 ccw(c2.29,4077.75) 2.29,4067.71 ; v4@7413.06,6353.06 cw(c7396.31,6336.31) 7420,6336.31 cw(c7443.69,6336.31) v4@7426.94,6353.06 ; v4@7415.89,6355.89 cw(c7405.97,6345.97) 7420,6345.97 cw(c7434.03,6345.97) v4@7424.11,6355.89 ; v4(7420,6360) 7420,6311.31 7526.05,6205.27 7526.05,5914.32 7559.25,5881.12 v4(7686.99,5753.37) J25.6@7686.99,5635.25 ; J25.6@7670.73,5689.02 ccw(c7631.46,5728.28) 7686.99,5728.28 ccw(c7742.52,5728.28) J25.6@7703.26,5689.02 ; J25.6@7673.56,5686.19 ccw(c7641.12,5718.62) 7686.99,5718.62 ccw(c7732.86,5718.62) J25.6@7700.43,5686.19 ; J25.6@7676.39,5683.36 ccw(c7650.78,5708.97) 7686.99,5708.97 ccw(c7723.2,5708.96) J25.6@7697.6,5683.36 ; v4@7677.18,5753.37 ccw(c7653.5,5753.37) 7670.25,5770.12 ccw(c7686.99,5786.87) v4@7686.99,5763.19 ; J25.6@7679.22,5680.53 ccw(c7660.44,5699.31) 7686.99,5699.31 ccw(c7713.55,5699.31) J25.6@7694.77,5680.53 ; v4@7680.06,5746.44 cw(c7663.31,5729.69) 7686.99,5729.69 cw(c7710.68,5729.69) v4@7693.93,5746.44 ; v4@7681.18,5753.37 ccw(c7667.15,5753.37) 7677.07,5763.29 ccw(c7686.99,5773.21) v4@7686.99,5759.19 ; v4@7682.89,5749.27 cw(c7672.97,5739.35) 7686.99,5739.35 cw(c7701.02,5739.35) v4@7691.1,5749.27 ; v1@7700.14,5334.99 ccw(c7683.92,5318.77) 7683.92,5341.71 ccw(c7683.92,5364.64) v1@7700.14,5348.43 ; v1@7702.97,5337.82 ccw(c7693.58,5328.43) 7693.58,5341.71 ccw(c7693.58,5354.99) v1@7702.97,5345.6 ; v1(7706.86,5341.71) 7658.29,5341.71 7640,5360 7640,5461.92 7742.41,5564.33 7742.41,5692.41 7805,5755 v4(7805,5785) ; v4@7798.06,5778.06 cw(c7781.31,5761.31) 7805,5761.31 cw(c7828.69,5761.31) v4@7811.94,5778.06 ; v4@7800.89,5780.89 cw(c7790.97,5770.97) 7805,5770.97 cw(c7819.03,5770.97) v4@7809.11,5780.89
  Top Layer w8: U30.F2@7187.17,2199.65 v2(7206.85,2219.33) ; U30.F2@7187.17,2205.49 ccw(c7187.17,2219.59) 7197.14,2209.62 ccw(c7207.11,2199.65) U30.F2@7193.01,2199.65 ; v2@7197.85,2219.33 cw(c7176.12,2219.33) 7191.49,2203.97 cw(c7206.85,2188.6) v2@7206.85,2210.33
  MidLayer1 w4: v4(-50,6230) 68.31,6230 120,6178.31 120,5965 75,5920 75,5136.9 116.9,5095 345,5095 445.5,4994.5 445.5,4635.5 376.04,4566.04 293.54,4566.04 267.5,4540 267.5,4417.5 140.19,4290.19 140.19,4245.44 -14.48,4090.78 v1(-14.48,4067.71) ; v4@-45.89,6225.89 cw(c-35.97,6215.97) -35.97,6230 cw(c-35.97,6244.03) v4@-45.89,6234.11 ; v4@-43.06,6223.06 cw(c-26.31,6206.31) -26.31,6230 cw(c-26.31,6253.69) v4@-43.06,6236.94 ; v1@-21.19,4074.43 ccw(c-37.41,4090.64) -14.48,4090.64 ccw(c8.46,4090.64) v1@-7.76,4074.43 ; v1@-18.36,4071.6 ccw(c-27.75,4080.99) -14.48,4080.99 ccw(c-1.2,4080.99) v1@-10.59,4071.6 ; v4(5065,6615) 6546.93,6615 6606.93,6555 7022.26,6555 7242.26,6335 7395,6335 v4(7420,6360) ; v2(7206.85,2219.33) 7227.19,2239.67 7227.19,2363.04 7473.52,2609.37 7473.52,2788.73 7530,2845.2 7531.86,2847.06 7531.86,3350.04 7723.52,3541.71 7723.52,3651.22 7705.1,3669.65 7596.92,3669.65 7580.29,3686.28 7580.29,4174.49 7602.52,4196.73 7602.52,4395.71 7640.19,4433.37 7640.19,4558.37 7665.19,4583.37 7743.19,4583.37 7751.52,4591.71 7751.52,4657.04 7706.86,4701.71 v1(7706.86,5341.71) ; v2@7206.85,2226.33 ccw(c7206.85,2243.23) 7218.8,2231.28 ccw(c7230.75,2219.33) v2@7213.85,2219.33 ; v2@7206.85,2230.33 ccw(c7206.85,2256.89) 7225.63,2238.11 ccw(c7244.41,2219.33) v2@7217.85,2219.33 ; v4@7410.19,6360 cw(c7386.5,6360) 7403.25,6343.25 cw(c7420,6326.5) v4@7420,6350.19 ; v4@7414.19,6360 cw(c7400.16,6360) 7410.08,6350.08 cw(c7420,6340.16) v4@7420,6354.19 ; v4(7686.99,5753.37) 7773.37,5753.37 v4(7805,5785) ; v4@7691.1,5749.27 cw(c7701.02,5739.35) 7701.02,5753.37 cw(c7701.02,5767.4) v4@7691.1,5757.48 ; v4@7693.93,5746.44 cw(c7710.68,5729.69) 7710.68,5753.37 cw(c7710.68,5777.06) v4@7693.93,5760.31 ; v1@7700.14,5334.99 cw(c7683.92,5318.77) 7706.86,5318.77 cw(c7729.79,5318.77) v1@7713.57,5334.99 ; v1@7702.97,5337.82 cw(c7693.58,5328.43) 7706.86,5328.43 cw(c7720.14,5328.43) v1@7710.75,5337.82 ; v4@7795.19,5785 cw(c7771.5,5785) 7788.25,5768.25 cw(c7805,5751.5) v4@7805,5775.19 ; v4@7799.19,5785 cw(c7785.16,5785) 7795.08,5775.08 cw(c7805,5765.16) v4@7805,5779.19
  MidLayer2 w4: v4@-56.94,6236.94 ccw(c-73.69,6253.69) -50,6253.69 ccw(c-26.31,6253.69) v4@-43.06,6236.94 ; v4@-54.11,6234.11 ccw(c-64.03,6244.03) -50,6244.03 ccw(c-35.97,6244.03) v4@-45.89,6234.11 ; v4(-50,6230) -50,6260 114,6424 114,6543.63 348.37,6778 2787,6778 2925,6640 5040,6640 v4(5065,6615)
  Bottom Layer w4: J33.B39@-711.58,2686.73 cw(c-698.3,2673.45) -698.3,2692.23 cw(c-698.3,2711.01) J33.B39@-711.58,2697.73 ; J33.B39@-708.76,2683.9 cw(c-688.65,2663.79) -688.65,2692.23 cw(c-688.65,2720.67) J33.B39@-708.76,2700.56 ; -703,2692.23 J33.B39@-785.98,2692.23 -687.23,2692.23 -671.81,2676.81 v1(-671.81,2650.04) ; v1@-678.53,2656.76 ccw(c-694.74,2672.98) -671.81,2672.98 ccw(c-648.87,2672.98) v1@-665.09,2656.76 ; v1@-675.7,2653.93 ccw(c-685.09,2663.32) -671.81,2663.32 ccw(c-658.53,2663.32) v1@-667.92,2653.93 ; v2@7206.85,2216.71 v2(7206.85,2219.33)
ATE.HOST_JTAG.SOFT.TMS: J25.8 J33.A41 U30.F7 | length 21682.1
  Top Layer w4: J33.A41@-785.98,2613.49 -682.24,2613.49 -669.29,2600.54 -660.71,2600.54 -647.5,2613.75 -647.5,2647.5 -565,2730 ; J33.A41@-711.58,2607.99 cw(c-698.3,2594.71) -698.3,2613.49 cw(c-698.3,2632.27) J33.A41@-711.58,2618.99 ; J33.A41@-708.76,2605.16 cw(c-688.65,2585.05) -688.65,2613.49 cw(c-688.65,2641.93) J33.A41@-708.76,2621.82 ; v4@-552.76,2724 ccw(c-565,2714.52) -565,2730 ; v4@-552.76,2736 cw(c-565,2745.48) -565,2730 ; v4@-549.6,2726.44 ccw(c-556.85,2720.83) -556.85,2730 ccw(c-556.85,2739.17) v4@-549.6,2733.56 ; v4(-545,2730) -565,2730 ; J25.8@7781.58,5695.1 ccw(c7779.91,5701.99) 7786.99,5701.99 ; J25.8@7786.99,5635.25 7786.99,5701.99 ; J25.8@7792.41,5695.1 cw(c7794.08,5701.99) 7786.99,5701.99 ; v4@7918.06,5531.94 ccw(c7901.31,5548.69) 7925,5548.69 ccw(c7948.69,5548.69) v4@7931.94,5531.94 ; v4@7920.89,5529.11 ccw(c7910.97,5539.03) 7925,5539.03 ccw(c7939.03,5539.03) v4@7929.11,5529.11 ; v4(7925,5525) 7925,5705 7910,5720 7805,5720 7786.99,5701.99
  Top Layer w8: U30.F7@7187.17,2002.8 v2(7206.85,2022.48) ; U30.F7@7187.17,2008.64 ccw(c7187.17,2022.74) 7197.14,2012.77 ccw(c7207.11,2002.8) U30.F7@7193.01,2002.8 ; v2@7197.85,2022.48 cw(c7176.12,2022.48) 7191.49,2007.12 cw(c7206.85,1991.75) v2@7206.85,2013.48
  MidLayer1 w4: v4@-551.94,2723.06 ccw(c-568.69,2706.31) -568.69,2730 ccw(c-568.69,2753.69) v4@-551.94,2736.94 ; v4@-549.11,2725.89 ccw(c-559.03,2715.97) -559.03,2730 ccw(c-559.03,2744.03) v4@-549.11,2734.11 ; v4(-545,2730) -592.39,2730 -718.5,2856.11 -718.5,3024.08 -650.04,3092.54 -632.23,3092.54 -622.89,3083.21 -561.79,3083.21 -545,3100 -545,3207.83 ; -544.98,3207.85 -544.98,3419.62 -444.81,3519.79 -444.81,4100 -420,4124.81 -420,4225.19 -444.81,4250 -444.81,4475 -382.19,4537.62 -382.19,4613.51 -474,4705.32 -474,5243.37 -413.81,5303.56 -319.15,5303.56 -287.52,5335.19 -287.52,5895.92 -231.43,5952 -13,5952 20,5985 20,6015 -10,6045 -220,6045 -275,6100 -275,6133.69 -207.73,6200.95 -80.95,6200.95 -67.95,6187.95 v4(-35,6187.95) ; v4@-41.94,6181.01 ccw(c-58.69,6164.27) -58.69,6187.95 ccw(c-58.69,6211.64) v4@-41.94,6194.89 ; v4@-39.11,6183.84 ccw(c-49.03,6173.92) -49.03,6187.95 ccw(c-49.03,6201.98) v4@-39.11,6192.06 ; v4(5100,6595) 5130,6595 5142,6607 6543.62,6607 6603.62,6547 7018.95,6547 7355.95,6210 7488.69,6210 7570,6128.69 ; v4@5104.11,6590.89 cw(c5114.03,6580.97) 5114.03,6595 cw(c5114.03,6609.03) v4@5104.11,6599.11 ; v4@5106.94,6588.06 cw(c5123.69,6571.31) 5123.69,6595 cw(c5123.69,6618.69) v4@5106.94,6601.94 ; v4@7563.06,6111.94 ccw(c7546.31,6128.69) 7570,6128.69 ; v4@7565.89,6109.11 ccw(c7555.97,6119.03) 7570,6119.03 ccw(c7584.03,6119.03) v4@7574.11,6109.11 ; v4(7570,6105) 7570,6128.69 ; v4@7576.94,6111.94 cw(c7593.69,6128.69) 7570,6128.69 ; v4(7860,1985) 7982.48,1985 8007.48,1960 8007.48,1808.03 8040,1775.51 v4(8040,1740) ; v4@7864.11,1980.89 cw(c7874.03,1970.97) 7874.03,1985 cw(c7874.03,1999.03) v4@7864.11,1989.11 ; v4@7866.94,1978.06 cw(c7883.69,1961.31) 7883.69,1985 cw(c7883.69,2008.69) v4@7866.94,1991.94 ; v4@8033.06,1746.94 ccw(c8016.31,1763.69) 8040,1763.69 ccw(c8063.69,1763.69) v4@8046.94,1746.94 ; v4@8035.89,1744.11 ccw(c8025.97,1754.03) 8040,1754.03 ccw(c8054.03,1754.03) v4@8044.11,1744.11
  MidLayer2 w4: v4@-41.94,6194.89 ccw(c-58.69,6211.64) -35,6211.64 ccw(c-11.31,6211.64) v4@-28.06,6194.89 ; v4@-39.11,6192.06 ccw(c-49.03,6201.98) -35,6201.98 ccw(c-20.97,6201.98) v4@-30.89,6192.06 ; v4(-35,6187.95) -35,6217.19 -32.19,6220 -32.19,6265.18 122,6419.37 122,6540.31 351.69,6770 2783.69,6770 2921.69,6632 5008,6632 5045,6595 v4(5100,6595) ; v4@5093.06,6588.06 ccw(c5076.31,6571.31) 5076.31,6595 ccw(c5076.31,6618.69) v4@5093.06,6601.94 ; v4@5095.89,6590.89 ccw(c5085.97,6580.97) 5085.97,6595 ccw(c5085.97,6609.03) v4@5095.89,6599.11 ; v4(8040,1740) 8042.54,1742.54 8230,1742.54 8232.94,1739.6 v4(8270.21,1739.6)
  Bottom Layer w4: 7194.1,1997.23 ccw(c7182,2009.33) v2@7197.13,2017.34 ; 7197.93,2001.06 ccw(c7187.01,2011.98) v2@7200.66,2019.21 ; 7201.76,2004.89 ccw(c7192.02,2014.63) v2@7204.2,2021.08 ; 7205.59,2008.72 ccw(c7197.03,2017.29) v2@7207.73,2022.95 ; v2(7206.85,2022.48) 7206.85,2009.98 7187.85,1990.98 7187.85,1896.5 7207.35,1877 7417,1877 7432.02,1892.02 7432.02,1935.9 7458.5,1962.37 7555.25,1962.37 7571.12,1946.5 7598.88,1946.5 7614.58,1962.21 7681.08,1962.21 7701.29,1942 7793.71,1942 7814.36,1962.64 7814.36,1973.96 7824.61,1984.21 v4@7859.21,1984.21 ; v4@7570,6095.19 cw(c7570,6071.5) 7586.75,6088.25 cw(c7603.5,6105) v4@7579.81,6105 ; v4@7570,6099.19 cw(c7570,6085.16) 7579.92,6095.08 cw(c7589.84,6105) v4@7575.81,6105 ; v4(7570,6105) 7615,6060 7879.65,6060 7982.81,5956.84 7982.81,5582.81 v4(7925,5525) 7982.81,5467.19 7982.81,5221.11 8256.69,4947.23 8256.69,4446.69 8229,4419 8229,4140 8215.36,4126.36 8215.36,3767.01 8349.84,3632.53 8349.84,3607.31 8366.28,3590.87 8380.77,3590.87 8391.02,3601.13 8391.02,3632.79 8331.02,3692.79 8331.02,3707.29 8341.28,3717.54 8355.77,3717.54 8407.35,3665.96 8407.35,3335.27 8456,3286.63 8456,2329.94 8424,2297.94 8263.69,2297.94 8246,2280.24 8246,1763.81 v4(8270.21,1739.6) ; v4@7925,5515.19 cw(c7925,5491.5) 7941.75,5508.25 cw(c7958.5,5525) 7934.81,5525 cw(c7958.5,5525) 7941.75,5541.75 cw(c7925,5558.5) v4@7925,5534.81 ; v4@7925,5519.19 cw(c7925,5505.16) 7934.92,5515.08 cw(c7944.84,5525) 7930.81,5525 cw(c7944.84,5525) 7934.92,5534.92 cw(c7925,5544.84) v4@7925,5530.81
ATE.KBD#.CLOCK: J31.5 J33.B47 R82.2 R85.2 | length 6454.6
  Top Layer w4: v1@2800.14,808.32 cw(c2783.92,792.11) 2806.86,792.11 cw(c2829.79,792.11) v1@2813.57,808.32 ; v1@2802.97,811.15 cw(c2793.58,801.76) 2806.86,801.76 cw(c2820.14,801.76) v1@2810.75,811.15 ; v1(2806.86,815.04) 2806.86,650.04 2892.05,564.85 J31.5@2892.05,421.1 ; J31.5@2871.19,441.96 ccw(c2820.84,492.31) 2892.05,492.31 ccw(c2963.26,492.31) J31.5@2912.9,441.96 ; J31.5@2874.02,439.13 ccw(c2830.49,482.66) 2892.05,482.66 ccw(c2953.6,482.66) J31.5@2910.08,439.13 ; J31.5@2876.85,436.3 ccw(c2840.15,473) 2892.05,473 ccw(c2943.94,473) J31.5@2907.25,436.3 ; J31.5@2879.68,433.47 ccw(c2849.81,463.34) 2892.05,463.34 ccw(c2934.29,463.34) J31.5@2904.42,433.47 ; J31.5@2882.5,430.65 ccw(c2859.47,453.68) 2892.05,453.68 ccw(c2924.63,453.68) J31.5@2901.59,430.65
  Bottom Layer w4: J33.B47@-785.98,2377.27 -702.73,2377.27 -671.36,2408.64 -614.95,2408.64 -551,2344.69 -551,2306.63 -571,2286.63 -571,1489.52 -551.48,1470 -510,1470 -496.29,1483.71 -191.1,1483.71 -66.44,1359.04 2780.96,1359.04 2800.87,1339.13 R85.2@2800.87,1005 R82.2@2800.87,950 2800.87,869.13 2806.86,863.14 v1(2806.86,815.04) ; J33.B47@-717.08,2373.05 ccw(c-717.08,2397.52) -699.78,2380.22 ; J33.B47@-717.08,2377.05 ccw(c-717.08,2411.17) -692.96,2387.04 ; J33.B47@-717.08,2381.05 ccw(c-717.08,2424.83) -686.13,2393.87 ; J33.B47@-717.08,2385.05 ccw(c-717.08,2438.49) -679.3,2400.7 ; J33.B47@-717.08,2389.05 ccw(c-717.08,2452.14) -672.47,2407.53 ; R82.2@2794.28,942.92 cw(c2778.37,927.01) 2800.87,927.01 cw(c2823.36,927.01) R82.2@2807.46,942.92 ; R82.2@2794.28,957.08 ccw(c2778.37,972.99) 2800.87,972.99 ccw(c2823.36,972.99) R82.2@2807.46,957.08 ; R85.2@2794.28,997.92 cw(c2778.37,982.01) 2800.87,982.01 cw(c2823.36,982.01) R85.2@2807.46,997.92 ; R85.2@2794.28,1012.08 ccw(c2778.37,1027.99) 2800.87,1027.99 ccw(c2823.36,1027.99) R85.2@2807.46,1012.08 ; R82.2@2797.11,945.75 cw(c2788.02,936.67) 2800.87,936.67 cw(c2813.71,936.67) R82.2@2804.63,945.75 ; R82.2@2797.11,954.25 ccw(c2788.02,963.33) 2800.87,963.33 ccw(c2813.71,963.33) R82.2@2804.63,954.25 ; R85.2@2797.11,1000.75 cw(c2788.02,991.67) 2800.87,991.67 cw(c2813.71,991.67) R85.2@2804.63,1000.75 ; R85.2@2797.11,1009.25 ccw(c2788.02,1018.33) 2800.87,1018.33 ccw(c2813.71,1018.33) R85.2@2804.63,1009.25 ; v1@2800.14,821.76 ccw(c2783.92,837.98) 2806.86,837.98 ccw(c2829.79,837.98) v1@2813.57,821.76 ; v1@2802.97,818.93 ccw(c2793.58,828.32) 2806.86,828.32 ccw(c2820.14,828.32) v1@2810.75,818.93
ATE.KBD#.DATA: J31.1 J33.B46 R83.2 R84.2 | length 6538.2
  MidLayer1 w4: J31.1@2949.93,343.53 ccw(c2899.58,393.89) 2970.79,393.89 ccw(c3042,393.89) J31.1@2991.64,343.53 ; J31.1@2952.76,340.71 ccw(c2909.23,384.23) 2970.79,384.23 ccw(c3032.34,384.23) J31.1@2988.82,340.71 ; J31.1@2955.59,337.88 ccw(c2918.89,374.57) 2970.79,374.57 ccw(c3022.68,374.57) J31.1@2985.99,337.88 ; J31.1@2958.42,335.05 ccw(c2928.55,364.92) 2970.79,364.92 ccw(c3013.03,364.92) J31.1@2983.16,335.05 ; J31.1@2961.24,332.22 ccw(c2938.21,355.26) 2970.79,355.26 ccw(c3003.37,355.26) J31.1@2980.33,332.22 ; J31.1@2970.79,322.68 2970.79,456.3 2981.52,467.04 3056.86,542.37 v1(3056.86,882.37) ; v1@3050.14,875.66 cw(c3033.92,859.44) 3056.86,859.44 cw(c3079.79,859.44) v1@3063.57,875.66 ; v1@3052.97,878.49 cw(c3043.58,869.1) 3056.86,869.1 cw(c3070.14,869.1) v1@3060.75,878.49
  MidLayer2 w4: v1@-531.81,1722.54 cw(c-531.81,1699.61) -515.59,1715.82 cw(c-499.37,1732.04) v1@-522.31,1732.04 ; v1@-531.81,1726.54 cw(c-531.81,1713.26) -522.42,1722.65 cw(c-513.03,1732.04) v1@-526.31,1732.04 ; v1(-531.81,1732.04) -493.14,1693.37 -493.14,1632.23 -460.01,1599.09 -392.73,1599.09 -301.13,1507.5 -114.87,1507.5 36.63,1356 2092.56,1356 2542.42,906.14 2569.57,879 2989,879 2992.37,882.37 v1(3056.86,882.37) ; v1@3050.14,875.66 ccw(c3033.92,859.44) 3033.92,882.37 ccw(c3033.92,905.31) v1@3050.14,889.09 ; v1@3052.97,878.49 ccw(c3043.58,869.1) 3043.58,882.37 ccw(c3043.58,895.65) v1@3052.97,886.26
  Bottom Layer w4: J33.B46@-785.98,2416.64 -611.64,2416.64 -543,2348 -543,2303.31 -563,2283.31 -563,1763.23 v1(-531.81,1732.04) ; J33.B46@-711.58,2411.14 cw(c-698.3,2397.86) -698.3,2416.64 cw(c-698.3,2435.42) J33.B46@-711.58,2422.14 ; J33.B46@-708.76,2408.31 cw(c-688.65,2388.2) -688.65,2416.64 cw(c-688.65,2445.08) J33.B46@-708.76,2424.97 ; v1@-541.31,1732.04 ccw(c-564.24,1732.04) -548.03,1748.26 ccw(c-531.81,1764.48) v1@-531.81,1741.54 ; v1@-537.31,1732.04 ccw(c-550.59,1732.04) -541.2,1741.43 ccw(c-531.81,1750.82) v1@-531.81,1737.54 ; v1@3050.14,889.09 ccw(c3034.13,905.1) 3056.77,905.1 ; R83.2@3050.18,942.92 cw(c3034.27,927.01) 3056.77,927.01 cw(c3079.27,927.01) R83.2@3063.36,942.92 ; R83.2@3050.18,957.08 ccw(c3034.27,972.99) 3056.77,972.99 ccw(c3079.27,972.99) R83.2@3063.36,957.08 ; R84.2@3050.18,997.92 cw(c3034.27,982.01) 3056.77,982.01 cw(c3079.27,982.01) R84.2@3063.36,997.92 ; v1@3052.97,886.26 ccw(c3043.78,895.45) 3056.77,895.45 ; R83.2@3053.01,945.75 cw(c3043.93,936.67) 3056.77,936.67 cw(c3069.61,936.67) R83.2@3060.53,945.75 ; R83.2@3053.01,954.25 ccw(c3043.93,963.33) 3056.77,963.33 ccw(c3069.61,963.33) R83.2@3060.53,954.25 ; R84.2@3053.01,1000.75 cw(c3043.93,991.67) 3056.77,991.67 cw(c3069.61,991.67) R84.2@3060.53,1000.75 ; v1@3056.77,882.62 R83.2@3056.77,950 R84.2@3056.77,1005 ; 3056.77,895.86 ccw(c3070.34,895.86) v1@3060.75,886.26 ; 3056.77,905.51 ccw(c3080,905.51) v1@3063.57,889.09
ATE.MIDI#.MIDI_OUT_PWR: J22.4 J33.B25 R199.2 | length 11619.7
  MidLayer1 w4: J22.4@4868.47,6356.32 ccw(c4787.87,6436.92) 4901.85,6436.92 ccw(c5015.83,6436.92) J22.4@4935.23,6356.32 ; J22.4@4871.29,6353.49 ccw(c4797.53,6427.26) 4901.85,6427.26 ccw(c5006.17,6427.26) J22.4@4932.41,6353.49 ; J22.4@4874.12,6350.66 ccw(c4807.18,6417.6) 4901.85,6417.6 ccw(c4996.52,6417.6) J22.4@4929.58,6350.66 ; J22.4@4876.95,6347.84 ccw(c4816.84,6407.95) 4901.85,6407.95 ccw(c4986.86,6407.95) J22.4@4926.75,6347.84 ; J22.4@4879.78,6345.01 ccw(c4826.5,6398.29) 4901.85,6398.29 ccw(c4977.2,6398.29) J22.4@4923.92,6345.01 ; J22.4@4882.61,6342.18 ccw(c4836.15,6388.63) 4901.85,6388.63 ccw(c4967.55,6388.63) J22.4@4921.09,6342.18 ; v4@4883.06,6673.06 cw(c4866.31,6656.31) 4890,6656.31 cw(c4913.69,6656.31) v4@4896.94,6673.06 ; J22.4@4885.44,6339.35 ccw(c4845.81,6378.98) 4901.85,6378.98 ccw(c4957.89,6378.98) J22.4@4918.26,6339.35 ; v4@4885.89,6675.89 cw(c4875.97,6665.97) 4890,6665.97 cw(c4904.03,6665.97) v4@4894.11,6675.89 ; v4(4890,6680) 4890,6486.85 4901.85,6475 J22.4@4901.85,6322.94
  MidLayer2 w4: v1@-679.64,3255.04 ccw(c-702.58,3255.04) -686.36,3271.26 ccw(c-670.14,3287.48) v1@-670.14,3264.54 ; v1@-675.64,3255.04 ccw(c-688.92,3255.04) -679.53,3264.43 ccw(c-670.14,3273.82) v1@-670.14,3260.54 ; v1(-670.14,3255.04) -705.5,3290.4 -705.5,3589.69 -692.38,3602.81 -676.65,3602.81 -505,3774.46 -505,3890 -561.54,3946.54 -659.04,3946.54 -673.98,3961.48 -673.98,3982.6 -635.42,4021.16 -635.42,4059.11 -709.81,4133.5 -709.81,4258.37 -693.14,4275.04 -593.14,4275.04 -576.48,4291.71 -576.48,4448.08 -628.81,4500.41 -628.81,4791.63 -576.48,4843.96 -576.48,6066.71 -509.81,6133.37 -279.25,6133.37 -187.59,6225.04 -118.9,6225.04 38.39,6382.33 38.39,6564.89 275.5,6802 2796.94,6802 2934.94,6664 4874,6664 ; v4@4880.19,6679.68 cw(c4859.02,6678.98) 4874,6664 ; v4@4884.19,6679.81 cw(c4871.65,6679.4) 4880.52,6670.52 cw(c4889.4,6661.65) v4@4889.81,6674.19 ; v4@4889.68,6670.19 ccw(c4888.98,6649.02) 4874,6664 ; v4(4890,6680) 4874,6664
  Bottom Layer w4: J33.B25@-785.98,3243.41 -681.77,3243.41 v1(-670.14,3255.04) ; J33.B25@-711.58,3237.91 cw(c-698.3,3224.63) -698.3,3243.41 cw(c-698.3,3262.19) J33.B25@-711.58,3248.91 ; J33.B25@-708.76,3235.08 cw(c-688.65,3214.98) -688.65,3243.41 cw(c-688.65,3271.85) J33.B25@-708.76,3251.74 ; J22.4@4875.66,6283.65 cw(c4843.03,6234.72) 4901.85,6234.72 ; J22.4@4877.88,6286.98 cw(c4848.02,6242.19) 4901.85,6242.19 cw(c4955.68,6242.19) J22.4@4925.82,6286.98 ; J22.4@4880.1,6290.31 cw(c4853,6249.66) 4901.85,6249.66 cw(c4950.7,6249.67) J22.4@4923.6,6290.31 ; J22.4@4882.32,6293.64 cw(c4857.98,6257.14) 4901.85,6257.14 cw(c4945.72,6257.14) J22.4@4921.38,6293.64 ; J22.4@4884.54,6296.97 cw(c4862.97,6264.61) 4901.85,6264.61 cw(c4940.73,6264.61) J22.4@4919.16,6296.97 ; J22.4@4886.75,6300.3 cw(c4867.95,6272.09) 4901.85,6272.09 cw(c4935.75,6272.09) J22.4@4916.95,6300.3 ; R199.2@4894.59,6167.08 ccw(c4878.68,6182.99) 4901.18,6182.99 ccw(c4923.68,6182.99) R199.2@4907.77,6167.08 ; R199.2@4897.42,6164.25 ccw(c4888.34,6173.33) 4901.18,6173.33 ccw(c4914.02,6173.33) R199.2@4904.94,6164.25 ; R199.2@4901.18,6160 4901.18,6234.04 4901.85,6234.71 ; J22.4@4901.85,6322.94 4901.85,6234.71 ; J22.4@4928.04,6283.65 ccw(c4960.67,6234.72) 4901.85,6234.72
ATE.MIDI#.MIDI_RX_N: D9.1 J20.5 J33.B22 U36.2 | length 8790.9
  MidLayer1 w4: J20.5@2854.61,6275.72 cw(c2854.61,6161.74) 2935.2,6242.34 cw(c3015.8,6322.94) J20.5@2901.82,6322.94 ; J20.5@2854.61,6279.72 cw(c2854.61,6175.4) 2928.37,6249.17 cw(c3002.14,6322.94) J20.5@2897.82,6322.94 ; J20.5@2854.61,6283.72 cw(c2854.61,6189.06) 2921.55,6256 cw(c2988.49,6322.94) J20.5@2893.82,6322.94 ; J20.5@2854.61,6287.72 cw(c2854.61,6202.71) 2914.72,6262.83 cw(c2974.83,6322.94) J20.5@2889.82,6322.94 ; J20.5@2854.61,6291.72 cw(c2854.61,6216.37) 2907.89,6269.65 cw(c2961.17,6322.94) J20.5@2885.82,6322.94 ; J20.5@2854.61,6295.72 cw(c2854.61,6230.03) 2901.06,6276.48 cw(c2947.52,6322.94) J20.5@2881.82,6322.94 ; J20.5@2854.61,6299.72 cw(c2854.61,6243.69) 2894.23,6283.31 cw(c2933.86,6322.94) J20.5@2877.82,6322.94 ; J20.5@2854.61,6322.94 2995.19,6182.35 v1(2995.19,6135.37) ; v1@2988.47,6142.09 ccw(c2972.26,6158.31) 2995.19,6158.31 ccw(c3018.13,6158.31) v1@3001.91,6142.09 ; v1@2991.3,6139.26 ccw(c2981.91,6148.65) 2995.19,6148.65 ccw(c3008.47,6148.65) v1@2999.08,6139.26
  MidLayer2 w4: -701.48,4205 -701.48,4136.48 -627.42,4062.42 -627.42,4017.84 -665.98,3979.29 -665.98,3964.79 -655.72,3954.54 -556.54,3954.54 -497,3895 -497,3771.14 -591.44,3676.71 -636.41,3631.73 -660,3608.14 -660,3584.81 -677.62,3567.19 -692.66,3567.19 -697.5,3562.35 -697.5,3380 -687,3369.5 v1(-687,3341) ; -701.35,4205 -673.81,4232.54 -603.46,4232.54 -600.19,4235.81 -587.73,4235.81 -559.81,4263.73 -559.81,4454.04 -612.81,4507.04 -612.81,4785 -559.81,4838 -559.81,5870 ; v1@-693.72,3347.72 ccw(c-709.94,3363.93) -687,3363.93 ccw(c-664.07,3363.93) v1@-680.28,3347.72 ; v1@-690.89,3344.89 ccw(c-700.28,3354.28) -687,3354.28 ccw(c-673.72,3354.28) v1@-683.11,3344.89 ; -560,5870 -560,5930 -546.66,5943.34 81.91,5943.34 82.75,5942.5 271.44,5942.5 411.98,6083.04 2942.86,6083.04 2959.86,6100.04 v1(2995.19,6135.37) ; v1@2985.69,6135.37 cw(c2962.76,6135.37) 2978.97,6119.16 cw(c2995.19,6102.94) v1@2995.19,6125.87 ; v1@2989.69,6135.37 cw(c2976.41,6135.37) 2985.8,6125.99 cw(c2995.19,6116.6) v1@2995.19,6129.87
  Bottom Layer w4: J33.B22@-785.98,3361.52 -690,3361.52 ; J33.B22@-711.39,3356.22 cw(c-699.2,3344.85) -699.2,3361.52 cw(c-699.2,3378.19) J33.B22@-711.39,3366.83 ; J33.B22@-708.47,3353.49 cw(c-690,3336.28) -690,3361.52 ; J33.B22@-708.47,3369.55 ccw(c-690,3386.76) -690,3361.52 ; v1@-692.18,3348.96 ccw(c-698.41,3358.52) -687,3358.52 ; v1(-687,3341) -687,3358.52 ; v1@-681.82,3348.96 cw(c-675.59,3358.52) -687,3358.52 ; D9.1@2986.02,6098.16 ccw(c2965.9,6119.18) 2995,6119.18 ; D9.1@2988.78,6095.26 ccw(c2974.86,6109.82) 2995,6109.82 ccw(c3015.15,6109.82) D9.1@3001.22,6095.26 ; v1@2990.64,6127.03 cw(c2986.47,6119.38) 2995.19,6119.38 ; v1(2995.19,6135.37) 2995.19,6119.37 ; v1@2999.74,6127.03 ccw(c3003.91,6119.38) 2995.19,6119.38 ; D9.1@3001.36,6074.9 cw(c3016.73,6059.53) 3016.73,6081.26 cw(c3016.73,6102.99) D9.1@3001.36,6087.62 ; D9.1@3003.99,6098.15 cw(c3024.1,6119.18) 2995,6119.18 ; D9.1@3004.19,6072.07 cw(c3026.38,6049.88) 3026.38,6081.26 cw(c3026.39,6112.65) D9.1@3004.19,6090.45 ; U36.2@3088.47,6079.35 ccw(c3062.27,6065.24) 3062.27,6095 ; U36.2@3088.46,6110.65 cw(c3062.27,6124.76) 3062.27,6095 ; U36.2@3091.99,6081.25 ccw(c3068.96,6068.85) 3068.96,6095 ccw(c3068.96,6121.15) U36.2@3091.99,6108.75 ; U36.2@3095.51,6083.15 ccw(c3075.66,6072.46) 3075.66,6095 ccw(c3075.66,6117.54) U36.2@3095.51,6106.85 ; U36.2@3099.03,6085.04 ccw(c3082.36,6076.06) 3082.36,6095 ccw(c3082.36,6113.94) U36.2@3099.03,6104.96 ; U36.2@3122.52,6095 3062.26,6095 ; -690,3361.52 -687,3358.52 ; 2995,6119.18 D9.1@2995,6081.26 3048.52,6081.26 3062.26,6095